# Altium PCB BOARD_2LAYER.PcbDoc (part 6 of 7)
Units mil, origin at the board's own origin, x right, y up, seen from the top; angles counter-clockwise.
Board outline 7677.17 x 7677.17 mil, 2 copper layers (Top Layer, Bottom Layer), stack 34.252 mil thick; 625 components, 375 nets, 1924 pads, 450 vias.
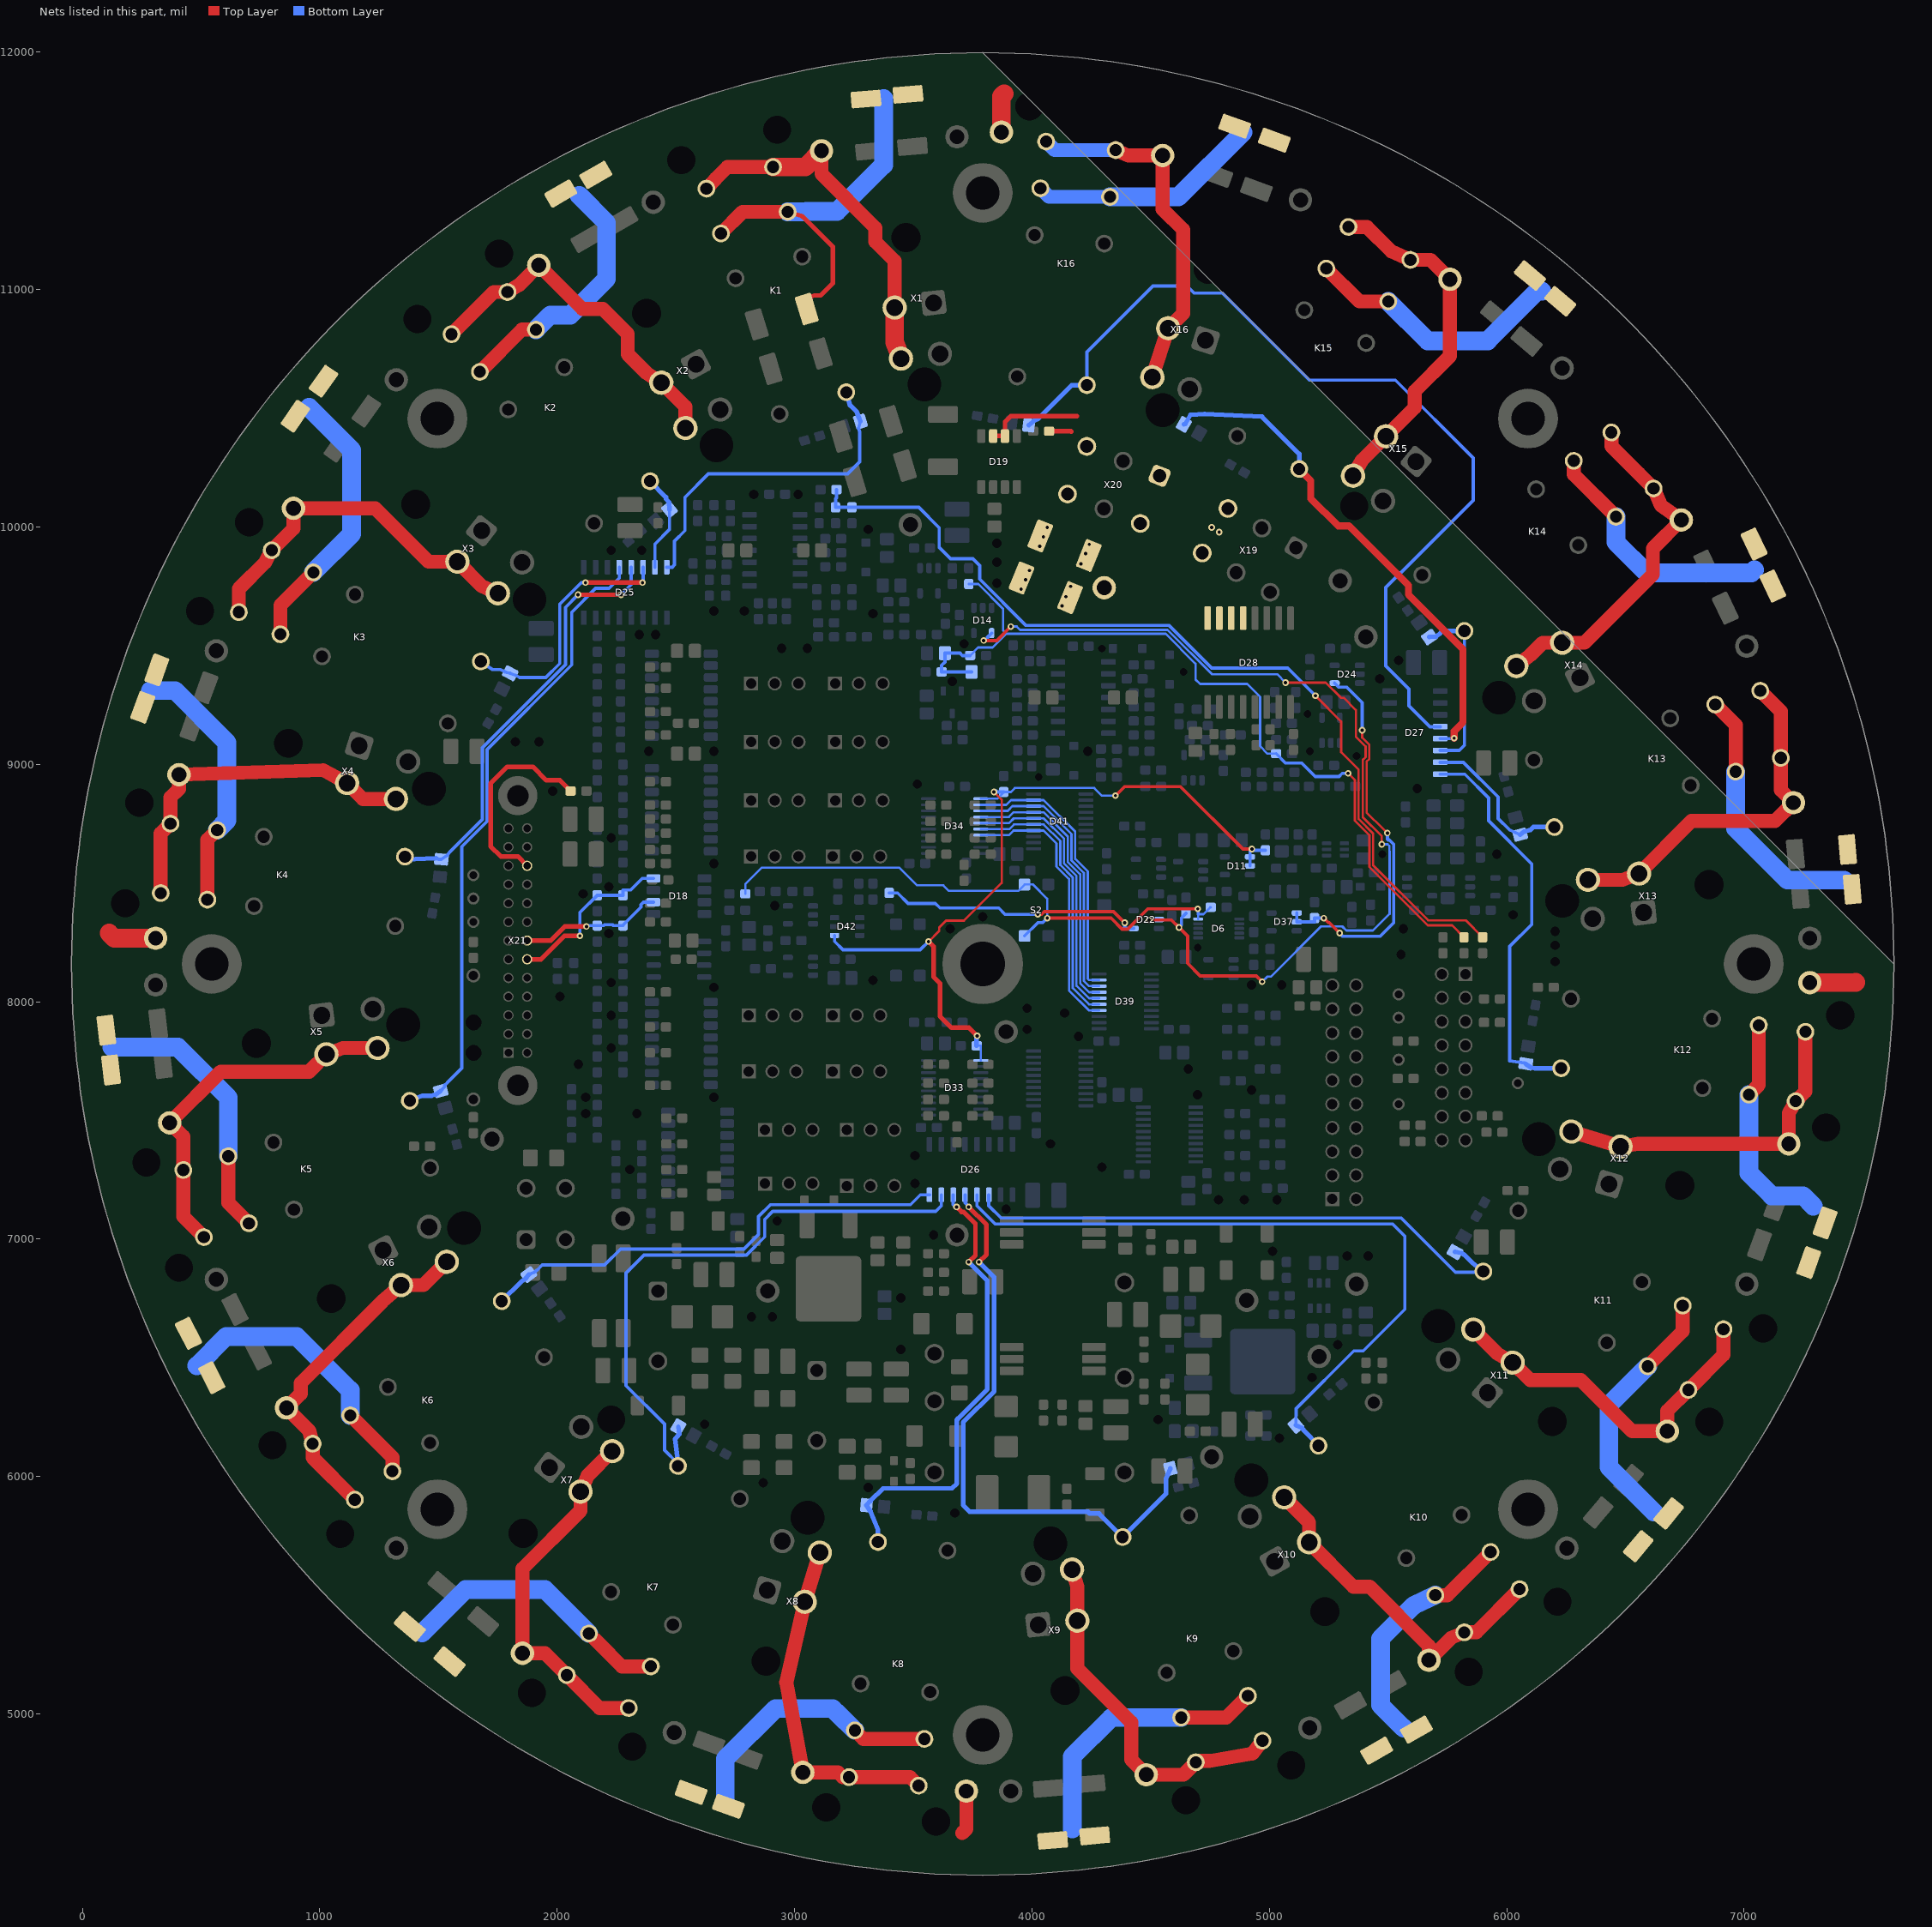
[diagram p6: the nets of this part, all layers, seen from the top]

## Via types
v1: diameter 27.56/27.56 (per signal layer), hole 13.78, Top Layer to Bottom Layer, 447 vias
v2: diameter 78.74, hole 55.12, Top Layer to Bottom Layer, 2 vias
v3: diameter 35.43/35.43 (per signal layer), hole 19.68, Top Layer to Bottom Layer, 1 vias

## Nets (pads, with @x,y where several pads share a name; then routed paths per layer and width w, separated by ;. In a path a pad name is that pad's centre, name@x,y a point inside that pad or via, vN(x,y) a via of type N, cw(c..) or ccw(c..) an arc to the next point about the centre after c; other vN are vias at no path point) (continued)
ON-CH-11: D34.17 D39.4 D41.4 | length 1152.2
  Bottom Layer w9.84: D34.17@3784.59,8701.77 3902.13,8701.77 3921.81,8721.46 D41.4@4007.03,8721.46 4049.35,8721.46 4103.44,8667.37 4103.44,8569.55 4155.98,8517 4155.98,8047.9 4240.3,7963.58 D39.4@4282.62,7963.58
ON-CH-12: D34.16 D39.5 D41.5 | length 1152.2
  Bottom Layer w9.84: D34.16@3784.59,8727.36 3904.24,8727.36 3923.92,8747.05 D41.5@4007.03,8747.05 4049.35,8747.05 4119.19,8677.21 4119.19,8576.07 4171.73,8523.53 4171.73,8057.74 4240.3,7989.17 D39.5@4282.62,7989.17
ON-CH-13: D34.15 D39.6 D41.6 | length 1152.2
  Bottom Layer w9.84: D34.15@3784.59,8752.95 3903.75,8752.95 3923.44,8772.64 D41.6@4007.03,8772.64 4049.35,8772.64 4134.94,8687.05 4134.94,8582.59 4187.48,8530.05 4187.48,8067.59 4240.3,8014.76 D39.6@4282.62,8014.76
ON-CH-14: D34.14 D39.7 D41.7 | length 1152.2
  Bottom Layer w9.84: D34.14@3784.59,8778.54 3903.27,8778.54 3922.95,8798.23 D41.7@4007.03,8798.23 4049.35,8798.23 4150.68,8696.9 4150.68,8589.11 4203.23,8536.57 4203.23,8077.43 4240.3,8040.35 D39.7@4282.62,8040.35
ON-CH-15: D34.13 D39.8 D41.8 | length 1152.2
  Bottom Layer w9.84: D34.13@3784.59,8804.13 3898.13,8804.13 3917.82,8823.82 D41.8@4007.03,8823.82 4049.35,8823.82 4166.43,8706.74 4166.43,8595.64 4218.97,8543.1 4218.97,8087.27 4240.3,8065.94 D39.8@4282.62,8065.94
ON-CH-16: D34.12 D39.9 D41.9 | length 1152.2
  Bottom Layer w9.84: D34.12@3784.59,8829.72 3891.89,8829.72 3911.58,8849.41 D41.9@4007.03,8849.41 4049.35,8849.41 4182.18,8716.58 4182.18,8602.16 4234.72,8549.62 4234.72,8097.11 4240.3,8091.54 D39.9@4282.62,8091.54
OUT: D28.5 D28.6 D28.7 D28.8 K1.11 K1.21 K2.11 K2.21 K3.11 K3.21 K4.11 K4.21 K5.11 K5.21 K6.11 K6.21 K7.11 K7.21 K8.11 K8.21 K9.11 K9.21 K10.11 K10.21 K11.11 K11.21 K12.11 K12.21 K13.11 K13.21 K14.11 K14.21 K15.11 K15.21 K16.11 K16.21 R238.2 X20.1 X20.4 | length 18165.4
  Top Layer w19.68: K1.21@2970.7,11327.78 3031.76,11309.37 3160.67,11180.46 3160.67,11026.82 3109.19,10975.34 3083.56,10975.34 3067.3,10970.36 R238.2@3051.43,10918.06
  Top Layer w59.06: K4.11@526.07,8430.33 525.73,8488.21 525.73,8682.33 K4.21@567.16,8722.74 ; K5.21@614.67,7349.36 614.67,7153.31 K5.11@701,7066.98 ; K3.11@833.73,9548.11 833.73,9670.2 K3.21@972.36,9808.82 ; K6.21@1128.14,6257.9 1305.84,6080.2 K6.11@1305.84,6022.09 ; K2.11@1674.14,10653.58 1852.08,10831.52 K2.21@1909.96,10831.28 ; K7.21@2133.57,5339.02 2174.72,5298.33 2272.66,5200.39 K7.11@2394.28,5200.39 ; K1.11@2689.87,11236.53 2781.12,11327.78 K1.21@2970.7,11327.78 ; K8.21@3253.68,4930.91 3289.66,4894.93 K8.11@3546.75,4894.93 ; K9.21@4628.74,4985.16 4818.32,4985.16 K9.11@4909.57,5076.4 ; K15.11@5240.18,11088.65 5378.8,10950.03 K15.21@5500.89,10950.03 ; K10.21@5698.99,5500.38 5749.88,5500.38 K10.11@5931.67,5682.16 ; K14.11@6282.31,10278.87 6282.31,10220.75 K14.21@6460.02,10043.05 ; K11.21@6593.51,6464.44 6741.15,6612.08 K11.11@6741.15,6720.16 ; K13.11@6878.42,9251.91 6964.75,9165.58 K13.21@6964.75,8969.54 ; K12.21@7020.63,7608.76 7061.72,7649.85 K12.11@7061.72,7901.16
  Bottom Layer w59.06: K16.11@4035.42,11426.73 4071.41,11390.74 K16.21@4328.5,11390.74
  Bottom Layer w78.74: 122.89,7808.73 402.24,7808.73 614.67,7596.3 K5.21@614.67,7349.36 ; 285.35,9310.58 390.11,9310.58 608.03,9092.65 608.03,8763.61 K4.21@567.16,8722.74 ; 481.95,6466.64 605.31,6590 901.99,6590 1128.14,6363.86 K6.21@1128.14,6257.9 ; 954.79,10503.46 1133.72,10324.53 1133.72,9970.18 K3.21@972.36,9808.82 ; 1431.06,5341.06 1613.81,5523.81 1948.78,5523.81 K7.21@2133.57,5339.02 ; K2.21@1909.96,10831.28 1971.32,10892.64 2055.28,10892.64 2207.7,11045.06 2207.7,11281.59 2093,11396.29 ; 2708.13,4644.18 2708.13,4811.13 2920.06,5023.06 3159.94,5023.06 3182.74,5000.27 K8.21@3253.68,4930.91 ; K1.21@2970.7,11327.78 3048.02,11327.78 3049.87,11329.63 3179.58,11329.63 3374.73,11524.79 3374.73,11804.73 ; 4169.85,4515.96 4169.85,4820.55 4334.46,4985.16 K9.21@4628.74,4985.16 ; K16.21@4328.5,11390.74 4617.15,11390.74 4889.08,11662.68 ; K15.21@5500.89,10950.03 5666.52,10784.4 5919.82,10784.4 6129.35,10993.92 6147.7,10993.92 ; 5566.01,4940.37 5468.39,5037.99 5468.39,5316.79 5609.39,5457.78 K10.21@5698.99,5500.38 ; K14.21@6460.02,10043.05 6460.02,9936.61 6590.39,9806.24 7030.78,9806.24 7044.12,9819.58 ; K11.21@6593.51,6464.44 6430.52,6301.46 6430.52,6039.72 6619.48,5850.77 ; K13.21@6964.75,8969.54 6964.75,8729.76 7181.6,8512.91 7420.68,8512.91 ; K12.21@7020.63,7608.76 7020.63,7278.1 7116.23,7182.5 7247.95,7182.5 7291.59,7138.86
OUT_CH1: K1.14 K1.24 TP33.1 X1.2 X1.4 | length 1559.5
  Top Layer w59.06: K1.14@2628.55,11425.25 2668.18,11467.43 2717.24,11516.49 K1.24@2909.38,11516.49 ; TP33.1@3113.33,11584.65 3113.33,11487.14 3340.38,11260.09 3340.38,11202.52 3421.62,11121.28 X1.2@3421.62,10924.16
  Top Layer w78.74: K1.24@2909.38,11516.49 3045.18,11516.49 TP33.1@3113.33,11584.65 ; X1.2@3421.62,10924.16 3421.62,10778.81 X1.4@3448.01,10709.24
OUT_CH2: K2.14 K2.24 TP35.1 X2.2 X2.4 | length 1483.8
  Top Layer w59.06: K2.14@1554.72,10812.05 1732.43,10989.75 K2.24@1790.54,10989.75 1839.93,11019.91 TP35.1@1922.38,11102.36 2106,10918.74 2192.33,10918.74 2297.06,10814.01 2297.06,10727.69 2376.05,10648.7 X2.2@2438.32,10607.96 2539.98,10506.3 X2.4@2539.98,10416.77
OUT_CH3: K3.14 K3.24 TP36.1 X3.2 X3.4 | length 1531.9
  Top Layer w59.06: K3.14@658.53,9641.27 658.53,9740.01 769.61,9851.08 K3.24@797.16,9901.98 888.92,9993.74 TP36.1@888.92,10078.74 1233.27,10078.74 1458.14,9853.87 X3.2@1579.47,9853.87 1682.25,9751.09 X3.4@1750.11,9720.56
OUT_CH4: K4.14 K4.24 TP37.1 X4.2 X4.4 | length 1486.5
  Top Layer w59.06: K4.14@329.57,8457.95 329.57,8709.26 K4.24@370.67,8750.35 370.67,8860.68 406.64,8896.65 TP37.1@406.64,8956.69 1013.62,8975.91 X4.2@1114.73,8921.36 1181.65,8854.45 X4.4@1320.67,8854.45
OUT_CH5: K5.14 K5.24 TP38.1 X5.2 X5.4 | length 1540.6
  Top Layer w59.06: K5.14@511.24,7008.97 424.91,7095.3 K5.24@424.91,7291.34 424.91,7432.51 TP38.1@367.27,7490.16 582.84,7705.73 954.73,7705.73 X5.2@1027.76,7778.76 1097.33,7805.15 X5.4@1242.68,7805.15
OUT_CH6: K6.14 K6.24 TP39.1 X6.2 X6.4 | length 1455.4
  Top Layer w59.06: K6.14@1147.37,5902.67 969.67,6080.37 K6.24@969.67,6138.49 954.44,6194.32 TP39.1@859.39,6289.37 919.25,6349.22 919.25,6393.9 1263.41,6738.06 X6.2@1341.8,6806.32 1436.43,6806.32 X6.4@1534.73,6904.62
OUT_CH7: K7.14 K7.24 TP40.1 X7.2 X7.4 | length 1545
  Top Layer w59.06: X7.4@2231.36,6107.25 2128.58,6004.47 X7.2@2098.04,5936.62 2098.04,5856.32 1853.49,5611.76 TP40.1@1853.49,5255.91 1948.33,5255.91 K7.24@2040.42,5163.82 2179.04,5025.2 K7.14@2301.13,5025.2
OUT_CH8: K8.14 K8.24 TP41.1 X8.2 X8.4 | length 1461.6
  Top Layer w59.06: X8.4@3105.94,5679.76 X8.2@3042.63,5472.68 2964.89,5133.13 TP41.1@3034.59,4753.94 3182.62,4753.94 3202.59,4733.97 K8.24@3229.49,4733.97 3486.58,4733.97 K8.14@3522.57,4697.98
OUT_CH9: K9.14 K9.24 TP42.1 X9.2 X9.4 | length 1531.3
  Top Layer w59.06: X9.4@4168.49,5608.44 4191.12,5537.56 X9.2@4191.12,5393.09 4191.12,5191.73 4417.76,4965.09 4417.76,4807.78 TP42.1@4481.44,4744.09 4637.71,4744.09 K9.24@4690.06,4796.45 4696.06,4802.44 4747.11,4802.44 4747.62,4801.93 4913.54,4830.66 4927.82,4832.7 K9.14@4970.89,4887.69
OUT_CH10: K10.14 K10.24 TP43.1 X10.2 X10.4 | length 1479.7
  Top Layer w59.06: X10.4@5062.29,5912.33 5167.26,5807.36 X10.2@5167.26,5722.95 5354.41,5535.8 5423.17,5535.8 5672.39,5286.59 TP43.1@5672.39,5226.38 5767.74,5321.73 K10.24@5821.16,5344.01 5872.05,5344.01 K10.14@6053.84,5525.8
OUT_CH11: K11.14 K11.24 TP44.1 X11.2 X11.4 | length 1517.2
  Top Layer w59.06: X11.4@5859.13,6619.15 5960.76,6517.51 X11.2@6025,6479.96 6098.89,6406.07 6312.39,6406.07 6527.52,6190.94 TP44.1@6676.32,6190.94 6676.32,6276.2 K11.24@6765.35,6365.23 6912.99,6512.87 K11.14@6912.99,6620.94
OUT_CH12: K12.14 K12.24 TP45.1 X12.2 X12.4 | length 1423.1
  Top Layer w59.06: X12.4@6272.15,7453.24 X12.2@6479.23,7389.93 6552.72,7401.57 TP45.1@7188.13,7401.57 7188.13,7531.05 K12.24@7217.12,7581.14 7258.21,7622.24 K12.14@7258.21,7873.55
OUT_CH13: K13.14 K13.24 TP46.1 X13.2 X13.4 | length 1523.2
  Top Layer w59.06: X13.4@6342.25,8513.75 6487.6,8513.75 X13.2@6557.17,8540.14 6778.4,8761.37 7130.61,8761.37 TP46.1@7207.82,8838.58 7154.5,8891.9 K13.24@7154.5,9027.55 7154.5,9223.6 K13.14@7068.17,9309.93
OUT_CH14: K14.14 K14.24 TP47.1 X14.2 X14.4 | length 1503.4
  Top Layer w59.06: X14.4@6040.35,9414.28 6098.88,9460.22 6151.24,9512.58 X14.2@6233.29,9512.58 6327.05,9512.58 6615.41,9800.94 6615.41,9909.56 TP47.1@6735.38,10029.53 6649.75,10090.44 K14.24@6618.48,10162.47 6556.68,10224.27 6440.78,10340.17 K14.14@6440.78,10398.28
OUT_CH15: K15.14 K15.24 TP48.1 X15.2 X15.4 | length 1502.7
  Top Layer w59.06: K15.14@5333.34,11263.85 5411.18,11263.85 5514.22,11160.81 K15.24@5594.05,11125.23 5679.05,11125.23 TP48.1@5760.97,11043.31 5760.97,10720.34 5612.41,10571.78 5612.41,10502.92 X15.2@5491.64,10382.14 5390,10280.51 X15.4@5352.45,10216.27
OUT_CH16: K16.14 K16.24 TP49.1 X16.2 X16.4 | length 1516.1
  Top Layer w59.06: K16.24@4352.68,11587.69 4405.9,11564.96 TP49.1@4550.34,11564.96 4550.34,11338.47 4636.37,11252.43 4636.37,10899.49 X16.2@4574.06,10837.18 X16.4@4507.15,10631.24
  Bottom Layer w59.06: K16.14@4059.6,11623.67 4095.59,11587.69 K16.24@4352.68,11587.69
R-CH-1: D25.16 H5.2 K1.A2 | length 1448.9
  Bottom Layer w13.78: D25.16@2461.56,9830.71 2484.2,9830.71 2494.25,9840.76 2494.25,9940.48 2538.17,9984.39 2538.17,10124.73 2636.95,10223.51 3223.12,10223.51 3274.31,10274.7 3274.31,10399.64 3269.13,10416.09 H5.2@3276.95,10444.32
  Bottom Layer w19.68: K1.A2@3217.67,10567.68 3233.86,10512.12 3262.6,10483.38 3267.71,10467.16 H5.2@3276.95,10444.32
R-CH-2: D25.15 H6.2 K2.A2 | length 420
  Bottom Layer w13.78: D25.15@2411.56,9830.71 2411.56,9928.02 2472.69,9989.16 2472.69,10026.58 2473.24,10042.35 H6.2@2472.69,10073.25
  Bottom Layer w19.68: K2.A2@2390.94,10193 2458.43,10125.51 2458.43,10118.09 2470.47,10103.46 H6.2@2472.69,10073.25
R-CH-3: D25.14 H7.2 K3.A2 | length 1077.4
  Top Layer w19.68: v1(2119.24,9765.75) v1(2359.39,9765.75)
  Bottom Layer w13.78: K3.A2@1678.02,9433.62 1727.69,9399.53 1760.73,9399.53 1779.58,9389.72 H7.2@1801.86,9383.57 1823.35,9375.91 1842.21,9366.1 1861.61,9366.1 1861.96,9365.75 1951.89,9365.75 2010.86,9424.72 2010.86,9675.42 2092.66,9757.23 2101.18,9765.75 v1(2119.24,9765.75) ; v1(2359.39,9765.75) 2361.56,9767.91 D25.14@2361.56,9830.71
R-CH-4: D25.13 H8.2 K4.A2 | length 1836.7
  Top Layer w19.68: v1(2087.74,9714.57) v1(2268.84,9714.57)
  Bottom Layer w13.78: H8.2@1488.94,8604.38 1495.08,8604.38 1499.2,8600.25 H8.2@1512.26,8600.25 1535.9,8616.82 1547.06,8630.78 1573.93,8657.65 1684.29,8768.01 1684.29,9070.32 2034.54,9420.56 2034.54,9661.37 v1(2087.74,9714.57) ; v1(2268.84,9714.57) 2311.56,9757.28 D25.13@2311.56,9830.71
  Bottom Layer w19.68: K4.A2@1358.6,8611.51 1359.08,8599.25 H8.2@1488.94,8604.38
R-CH-5: D25.12 H9.2 K5.A2 | length 2690.7
  Bottom Layer w13.78: H9.2@1509.16,7624.71 1526.17,7641.72 1526.17,7648.11 1537.87,7659.81 1537.87,7661.49 1597.33,7720.95 1597.33,8653.21 1703.98,8759.86 1703.98,9062.16 2061.12,9419.3 2061.12,9640.88 2161.95,9741.71 2218.23,9741.71 2261.56,9785.03 D25.12@2261.56,9830.71
  Bottom Layer w19.68: K5.A2@1378.96,7583.03 1432.64,7604.64 1471.5,7604.64 1487.93,7609.04 H9.2@1509.16,7624.71
R-CH-6: D26.16 H10.2 K6.A2 | length 2028.1
  Bottom Layer w13.78: H10.2@1880.19,6850.74 1901.48,6860.04 1918.34,6872.74 1936.59,6890.99 2199.57,6890.99 2267.22,6958.64 2786.78,6958.64 2848.33,7020.19 2848.33,7095.04 2898.52,7145.22 3488.09,7145.22 3529.87,7187.01 D26.16@3568.25,7187.01
  Bottom Layer w19.68: K6.A2@1766.42,6738.88 1849.16,6821.62 1867.26,6835.26 H10.2@1880.19,6850.74
R-CH-7: D26.15 H11.2 K7.A2 | length 2599.7
  Bottom Layer w9.84: K7.A2@2508.78,6044.68 K7.A2@2508.78,6056.26
  Bottom Layer w13.78: K7.A2@2508.78,6056.26 2507.18,6056.26 2452.3,6111.14 2452.3,6220.82 2289.99,6383.14 2289.99,6857.73 2365.31,6933.05 2797.38,6933.05 2873.92,7009.59 2873.92,7083.23 2907.98,7117.29 3594.79,7117.29 3618.25,7140.75 D26.15@3618.25,7187.01
  Bottom Layer w19.68: K7.A2@2508.78,6056.26 2497.05,6157.97 2513.98,6179.17 H11.2@2510.07,6209.65
R-CH-8: D26.14 H12.2 K8.A2 | length 1945.3
  Top Layer w19.68: v1(3682.23,7135.83) 3703.11,7114.95 3711.81,7114.95 3761.68,7065.07 3761.68,6931.82 v1(3733.41,6903.54)
  Bottom Layer w13.78: D26.14@3668.25,7187.01 3668.25,7145.67 v1@3678.09,7135.83
  Bottom Layer w19.68: K8.A2@3351.08,5724.17 3351.08,5775.26 3319.46,5853.51 H12.2@3302.45,5879.24 3319.81,5897.45 3372.86,5950.5 3663.29,5950.5 3683.93,5971.14 3683.93,6238.31 3687.12,6241.51 3687.12,6243.53 3811.74,6368.15 3811.74,6825.21 v1(3733.41,6903.54) ; v1@3678.09,7135.83 v1(3682.23,7135.83)
R-CH-9: D26.13 H13.2 K9.A2 | length 2533.9
  Top Layer w19.68: v1(3733.41,7135.83) 3807.93,7061.31 3807.93,6934.76 v1(3776.72,6903.54)
  Bottom Layer w13.78: D26.13@3718.25,7187.01 3718.25,7153.22 v1@3733.41,7138.07
  Bottom Layer w19.68: v1(3733.41,7135.83) v1@3733.41,7138.07 ; v1(3776.72,6903.54) 3840.69,6839.56 3840.69,6358.89 3709.52,6227.71 3709.52,5879.89 3737.36,5852.05 4235.38,5852.05 4242.79,5844.65 4282.38,5844.65 K9.A2@4381.77,5745.26 4563.85,5927.33 4563.85,5989.43 4570.55,6005.39 H13.2@4583.11,6033.63
R-CH-10: D26.12 H14.2 K10.A2 | length 3041.2
  Bottom Layer w13.78: D26.12@3768.25,7187.01 3768.25,7140.75 3844.82,7064.18 5519.1,7064.18 5570.92,7012.36 5570.92,6704.59 5395.72,6529.39 5355.54,6529.39 5112.75,6286.61 5112.75,6262.79 5111.69,6247.02 H14.2@5112.24,6216.12
  Bottom Layer w19.68: H14.2@5112.24,6216.12 5136.94,6204.77 5147.47,6192.22 5167.33,6172.35 K10.A2@5206.95,6130.16
R-CH-11: D26.11 H15.2 K11.A2 | length 2395
  Bottom Layer w13.78: D26.11@3818.25,7187.01 3818.25,7140.75 3869.84,7089.16 5555.75,7089.16 5783.67,6861.23 5898.56,6861.23 K11.A2@5901.37,6864.05
  Bottom Layer w19.68: H15.2@5781.64,6945.96 5807.73,6942.02 5822.46,6933.51 5856,6899.98 K11.A2@5901.37,6864.05
R-CH-12: D27.16 H16.2 K12.A2 | length 1690.6
  Bottom Layer w13.78: D27.16@5719.63,8958.86 5823.69,8958.86 5923.83,8858.71 5923.83,8762.17 6105.52,8580.48 6105.52,8325.73 6012.82,8233.03 6012.82,7751.22 6076.13,7742.33 H16.2@6080.57,7738.55
  Bottom Layer w19.68: H16.2@6080.57,7738.55 6103.1,7722.36 6119.94,7719.99 K12.A2@6229.19,7719.99
R-CH-13: D27.15 H17.2 K13.A2 | length 666.3
  Bottom Layer w13.78: D27.15@5719.63,9008.86 5817.67,9008.86 5963.73,8862.8 5963.73,8772.3 6012.31,8723.72 6027.8,8716.48 H17.2@6056.08,8704.03
  Bottom Layer w19.68: H17.2@6056.08,8704.03 6072.98,8716.86 6100.01,8724.1 6111.79,8735.87 K13.A2@6200.46,8735.87
R-CH-14: D27.14 H18.2 K14.A2 | length 749
  Bottom Layer w13.78: D27.14@5719.63,9058.86 5800.21,9058.86 5821.74,9080.38 K14.A2@5821.74,9562.07
  Bottom Layer w19.68: H18.2@5674.15,9536.29 5702.25,9539 5716.18,9548.75 5729.5,9562.07 K14.A2@5821.74,9562.07
R-CH-15: D27.13 H19.2 K15.A2 | length 2159.2
  Top Layer w29.53: K15.A2@5125.69,10244.37 5174.43,10195.62 5174.43,10119.62 5289.29,10004.76 5335.49,10004.76 5585.88,9754.37 5585.88,9715.36 5815.99,9485.25 5815.99,9177.07 5778.68,9139.76 v1(5778.68,9110.24)
  Bottom Layer w13.78: D27.13@5719.63,9108.86 5777.31,9108.86 v1(5778.68,9110.24)
  Bottom Layer w19.68: H19.2@4639.58,10432.09 4645.75,10434.44 4667.62,10472.35 4727.57,10476.09 4968.87,10464.39 5125.69,10307.58 K15.A2@5125.69,10244.37
R-CH-16: D27.12 H20.2 K16.A2 | length 3899.8
  Bottom Layer w13.78: K16.A2@4231.1,10597.48 4231.1,10736.56 4509.52,11014.98 4653.07,11014.98 4682.59,10985.47 4802.29,10985.47 5169.17,10618.59 5530.84,10618.59 5858.95,10290.48 5858.95,10111.61 5553.69,9806.34 5551.69,9806.34 5490.63,9745.28 5490.63,9415.22 5588.37,9317.49 5588.37,9246.81 5676.32,9158.86 D27.12@5719.63,9158.86
  Bottom Layer w19.68: H20.2@3987.07,10428.51 4010.1,10448.68 4025.99,10455.59 4167.88,10597.48 K16.A2@4231.1,10597.48
Ref: C81.1 C82.1 R170.1 R204.1 R223.1 R225.1 R243.1 | length 3617.8
  Top Layer w9.84: v1(5331.83,8962.6) 5360.1,8934.33 5360.1,8763.06 5421.4,8701.75 5421.4,8567.96 5667.28,8322.08 5769.6,8322.08 R170.1@5820.02,8271.65
  Bottom Layer w9.84: R225.1@3733.41,9759.84 3773.9,9759.84 3878.22,9655.52 3878.22,9565.32 3890.96,9552.57 3890.96,9550.22 ; R204.1@3739.31,9458.66 3773.35,9492.7 3833.44,9492.7 3890.96,9550.22 ; R223.1@5028.68,9045.28 4992.42,9045.28 4960.77,9076.92 4960.77,9284.47 4906.16,9339.07 4707.96,9339.07 4689.12,9357.92 4689.12,9424.09 4562.99,9550.22 3893.31,9550.22 3890.96,9550.22
  Bottom Layer w13.78: R204.1@3739.31,9458.66 3706.83,9458.66 3696.99,9468.5 C82.1@3633.01,9468.5 3633.01,9431.17 3619.24,9417.39 R243.1@3619.24,9389.76 C81.1@3745.22,9389.76 ; R223.1@5028.68,9045.28 5068.12,9005.84 5136.53,9005.84 5193.2,8949.17 5293.8,8949.17 5307.23,8962.6 v1(5331.83,8962.6)
REZET: D6.5 R91.1 R178.2 S2.3 S2.4 | length 2424.1
  Top Layer w13.78: v1(4064.12,8352.36) 4333.62,8352.36 4379.88,8306.1 4402.39,8306.1 4488.02,8391.73 v1(4697.98,8391.73)
  Bottom Layer w9.84: R178.2@2792.46,8454.72 2792.46,8495.69 2861.9,8565.13 3440.99,8565.13 3515.69,8490.44 3626.4,8490.44 3649.58,8467.26 3942.01,8467.26 S2.4@3968.84,8494.09 4004.72,8494.09 4064.12,8434.7 v1(4064.12,8352.36) ; D6.5@4699.94,8348.43 4699.94,8368.6 4721.93,8368.6 4751.13,8397.8 R91.1@4753.09,8397.8
  Bottom Layer w13.78: S2.3@3968.84,8277.56 4024.85,8333.57 4045.33,8333.57 v1(4064.12,8352.36) ; v1(4697.98,8391.73) 4697.98,8382.38 4699.94,8380.41 4699.94,8368.6
REZET_COM: C134.2 D18.4 R79.2 X21.19 | length 744
  Top Layer w19.68: X21.19@1873.17,8179.13 1931.65,8179.13 2030.08,8277.56 v1(2095.61,8277.56)
  Bottom Layer w13.78: v1(2095.61,8277.56) 2095.61,8375.98 C134.2@2168.45,8448.82 R79.2@2276.72,8448.82 2276.72,8470.86 2309.2,8470.86 2358.22,8519.88 D18.4@2405.46,8519.88
SHILD: R186.2 X21.24 | length 860.8
  Top Layer w19.68: X21.24@1873.17,8572.83 1833.74,8612.27 1762.15,8612.27 1719.3,8655.12 1719.3,8919.63 1789.59,8989.92 1896.89,8989.92 1954.03,8932.78 2011.25,8932.78 R186.2@2056.24,8887.8
TABU: D22.4 R181.1 | length 1113.5
  Top Layer w13.78: v1(4024.75,8368.11) 4039.71,8368.11 4051.65,8380.06 4343.51,8380.06 v1(4390.89,8332.68)
  Bottom Layer w13.78: R181.1@3398.76,8458.66 3433.8,8458.66 3477.96,8414.5 3593.01,8414.5 3612.51,8395 3860.04,8395 3886.93,8368.11 v1(4024.75,8368.11) ; v1(4390.89,8332.68) 4390.89,8312.01 4393.84,8309.06 D22.4@4428.29,8309.06
TABU_I: D24.4 D37.1 D37.2 R95.1 | length 1662.5
  Top Layer w9.84: v1(5390.89,9143.7) 5390.89,9112.43 5421,9082.32 5421,9023.52 5409.59,9012.11 5409.59,8797.7 5479.26,8728.03 5479.79,8728.03 v1(5497.19,8710.63)
  Top Layer w13.78: v1(5229.47,8352.36) 5248.26,8333.57 5252.2,8333.57 v1(5296.4,8289.37)
  Bottom Layer w13.78: D37.1@5115.3,8374.02 D37.2@5115.3,8336.61 5190.1,8336.61 R95.1@5190.1,8352.36 v1(5229.47,8352.36) ; D24.4@5274.75,9342.52 5291.91,9325.36 5325.96,9325.36 5390.89,9260.43 v1(5390.89,9143.7) ; v1(5296.4,8289.37) 5310.14,8275.63 5465.78,8275.63 5523.55,8333.4 5523.55,8362.65 5523.92,8363.03 5523.92,8642.09 5523.76,8642.25 5523.76,8662.85 5505.51,8681.1 5500.14,8681.1 5497.19,8684.06 v1(5497.19,8710.63)
TABU_U: D14.4 D22.2 R94.1 | length 4166.5
  Top Layer w9.84: v1(5068.05,9344.49) 5156.94,9344.49 5237.68,9344.5 5301.55,9280.63 5313.08,9280.63 5364.53,9229.18 5364.53,9116.52 5405.25,9075.8 5405.25,9030.04 5393.8,9018.6 5393.8,8777.95 5473.57,8698.18 v1(5473.57,8663.39)
  Top Layer w13.78: v1(3796.4,9521.65) 3851.52,9521.65 v1(3910.57,9580.71) ; v1(4493.25,8344.49) 4587.74,8344.49 v1(4619.24,8312.99) 4655.69,8276.53 4655.69,8161.97 4708.78,8108.88 4945.39,8108.88 v1(4969.63,8084.65)
  Bottom Layer w9.84: v1(3910.57,9580.71) 3935.67,9580.71 3949.68,9566.7 4571.17,9566.7 4757.95,9379.92 5032.63,9379.92 v1(5068.05,9344.49) ; v1(4969.63,8084.65) 4990.97,8105.98 5005.6,8105.98 5217.05,8317.43 5306.96,8317.43 5324.2,8300.2 5436.04,8300.2 5506.2,8370.36 5506.2,8634.75 5506.05,8634.91 5506.05,8655.51 5498.17,8663.39 v1(5473.57,8663.39)
  Bottom Layer w13.78: v1(3796.4,9521.65) 3797.39,9520.67 3807.23,9520.67 3812.7,9526.15 3812.7,9535.99 D14.4@3829.87,9553.15 ; v1(4493.25,8344.49) 4495.22,8346.46 D22.2@4534.59,8346.46 ; v1(4619.24,8312.99) 4629.93,8323.68 4629.93,8353.21 R94.1@4648.76,8372.05
U_SUM_COM: C114.2 R172.1 R174.1 R217.1 | length 3910.6
  Top Layer w9.84: v1(5194.04,9289.37) 5302.71,9180.7 5302.71,9051.21 5375.85,8978.08 5375.85,8769.58 5437.15,8708.28 5437.15,8574.48 5668.38,8343.24 5827.17,8343.24 R172.1@5898.76,8271.65
  Bottom Layer w13.78: R174.1@3176.32,10157.48 3176.32,10123.03 3172.39,10119.09 R217.1@3172.39,10082.68 C114.2@3241.28,10082.68 3523.33,10082.68 3608.81,9997.19 3608.81,9915.1 3657.31,9866.6 3750.44,9866.6 3779.73,9837.32 3779.73,9780.6 3975.18,9585.15 4577.77,9585.15 4757.13,9405.79 5077.61,9405.79 v1(5194.04,9289.37)
WRITE: D11.1 D11.2 D33.11 D34.11 D42.4 R59.1 R60.1 R101.1 | length 3391.6
  Top Layer w9.84: v1(3564.12,8253.94) 3609.17,8298.99 3609.17,8312.78 3638.08,8341.69 3713.48,8341.69 3872.45,8500.66 3872.45,8851.12 v1(3839.71,8883.86)
  Top Layer w13.78: v1(4351.52,8868.11) 4389.99,8906.58 4625.42,8906.58 4888.3,8643.7 v1(4926.32,8643.7)
  Top Layer w19.68: v1(3564.12,8253.94) 3584.96,8233.09 3584.96,8105.49 3612.26,8078.2 3612.26,7939.72 3661.07,7890.9 3734.24,7890.9 v1(3768.84,7856.3)
  Bottom Layer w9.84: R60.1@3766.87,7814.96 3784.59,7814.96 D33.11@3784.59,7752.95 ; D34.11@3784.59,8855.32 3854.47,8855.32 3881.05,8881.89 R59.1@3881.05,8883.86 3911.56,8883.86 3928.29,8900.59 4009.3,8900.59 4009.46,8900.43 4262.6,8900.43 4294.93,8868.11 v1(4351.52,8868.11)
  Bottom Layer w13.78: D42.4@3168.45,8279.53 3168.45,8254.55 3203.97,8219.02 3529.21,8219.02 v1(3564.12,8253.94) ; v1(3839.71,8883.86) 3844.41,8888.56 3848.57,8888.56 3853.27,8883.86 R59.1@3881.05,8883.86 ; D11.2@4918.45,8572.83 D11.1@4918.45,8610.24 4918.45,8634.84 v1@4927.31,8643.7 ; v1(4926.32,8643.7) v1@4927.31,8643.7 ; R101.1@4983.41,8637.8 4933.21,8637.8 v1@4927.31,8643.7
  Bottom Layer w19.68: R60.1@3766.87,7814.96 3766.87,7854.33 v1(3768.84,7856.3)
WRITE_COM: C133.2 D18.2 R78.2 X21.20 | length 610.2
  Top Layer w19.68: X21.20@1873.17,8257.87 1972.58,8257.87 2031.64,8316.93 v1(2123.17,8316.93)
  Bottom Layer w13.78: v1(2123.17,8316.93) 2127.11,8320.87 C133.2@2168.45,8320.87 2196.74,8320.87 2200.93,8325.05 2231.73,8325.05 2235.92,8320.87 R78.2@2276.72,8320.87 2276.72,8322.83 2352.86,8398.98 2352.86,8409.61 2363.13,8419.88 D18.2@2405.46,8419.88
~IN_COM: R33.1 R34.1 TP11.1 X19.3 X19.6
  other v1: 4127.11,9667.32 4142.86,9706.69 4162.54,9750 4205.85,9844.49 4225.53,9887.8 4241.28,9927.17 4788.53,9978.35 4757.03,9998.03
~OUT: C116.2 D19.2 D19.3 R1.1 R2.1 R3.1 R4.1 R5.1 R6.1 R7.1 R8.1 R9.1 R10.1 R11.1 R12.1 R13.1 R14.1 R15.1 R16.1 R17.1 R18.1 R19.1 R20.1 R21.1 R22.1 R23.1 R24.1 R25.1 R26.1 R27.1 R28.1 R29.1 R30.1 R31.1 R32.1 R33.2 R34.2 TP1.1 TP2.1 TP3.1 TP4.1 X20.3 X20.6 | length 1488.2
  Top Layer w9.84: v1(3953.88,9738.19) 3953.88,9762.8 3954.54,9762.8 3956,9764.26 R33.2@3956,9785.39 ; v1(3973.57,9777.56) 3963.29,9777.56 3963.29,9778.11 R33.2@3956,9785.39 ; v1(3989.31,9816.93) 3971.91,9799.53 3970.14,9799.53 R33.2@3956,9785.39 ; v1(4032.62,9919.29) 4032.62,9960.43 R34.2@4034.74,9962.56 R34.2@4035.25,9963.07 ; v1(4048.37,9958.66) 4043.96,9963.07 R34.2@4035.25,9963.07 ; v1(4064.12,9998.03) 4046.72,9980.63 4046.72,9974.53 R34.2@4035.25,9963.07
  Top Layer w19.68: D19.3@3836.36,10383.07 D19.2@3886.36,10383.07 3886.36,10442.93 3910.07,10466.63 4187.4,10466.63 4188.42,10467.65 ; C116.2@4071.99,10403.54 4163.68,10403.54 4164.96,10402.27
  Top Layer w59.06: 3705.94,4497.98 3723.57,4515.61 TP4.1@3723.57,4675.2
  Top Layer w78.74: 112.31,8289.06 133.65,8267.72 TP3.1@308.21,8267.72 ; TP1.1@3871.2,11663.39 3871.2,11814.39 3882.34,11825.53 ; TP2.1@7276.72,8080.71 7468.62,8080.71 7470.02,8082.1
pads on no net: D4.14 D4.15 D4.16 D4.17 D4.26 D4.27 D4.28 D6.2 D6.7 D25.10 D25.11 D26.10 D27.10 D27.11 D28.9 D28.16 KW9. KW10. X1. X2. X3. X4. X5. X6. X7. X8. X9. X10. X11. X12. X13. X14. X15. X16. X17.17 X17.18 X19.2 X19.5 X20.2 X20.5 X21.

## Polygon pours and split planes (outlines as drawn)
+U_COM on Bottom Layer "+U_COM_L02_P107" (solid, remove dead copper, pour order 107): 2453.88,7027.56 2552.31,7027.56 2552.31,7135.83 2453.88,7135.83
+U_COM on Bottom Layer "+U_COM_L02_P106" (solid, remove dead copper, pour order 106): 2552.31,7027.56 2591.68,7027.56 2591.68,7549.21 2552.31,7549.21
+U_COM on Bottom Layer "+U_COM_L02_P105" (solid, remove dead copper, pour order 105): 2522.78,7618.11 2591.68,7549.21 2552.31,7549.21 2483.41,7618.11
+U_COM on Bottom Layer "+U_COM_L02_P104" (solid, remove dead copper, pour order 104): 2483.41,7618.11 2522.78,7618.11 2522.78,9478.35 2483.41,9478.35
-U_COM on Bottom Layer "-U_COM_L02_P103" (solid, remove dead copper, pour order 103): 2611.36,7135.83 2650.73,7135.83 2650.73,7549.21 2611.36,7549.21
-U_COM on Bottom Layer "-U_COM_L02_P102" (solid, remove dead copper, pour order 102): 2542.46,7618.11 2611.36,7549.21 2650.73,7549.21 2581.83,7618.11
-U_COM on Bottom Layer "-U_COM_L02_P101" (solid, remove dead copper, pour order 101): 2542.46,8061.02 2562.15,8061.02 2562.15,8572.83 2542.46,8572.83
-U_COM on Bottom Layer "-U_COM_L02_P100" (solid, remove dead copper, pour order 100): 2542.46,7618.11 2581.83,7618.11 2581.83,8070.87 2542.46,8070.87
-U_COM on Bottom Layer "-U_COM_L02_P099" (solid, remove dead copper, pour order 99): 2542.46,8572.83 2591.68,8572.83 2591.68,9478.35 2542.46,9478.35
-U_COM on Bottom Layer "-U_COM_L02_P098" (solid, remove dead copper, pour order 98): 2591.68,8572.83 2562.15,8543.31 2562.15,8572.83
-U_COM on Bottom Layer "-U_COM_L02_P097" (solid, remove dead copper, pour order 97): 2581.83,8070.87 2562.15,8090.55 2562.15,8070.87
-U_COM on Bottom Layer "-U_COM_L02_P096" (solid, remove dead copper, pour order 96): 2562.15,8297.24 2581.83,8297.24 2581.83,8316.93 2562.15,8316.93
-U_COM on Bottom Layer "-U_COM_L02_P095" (solid, remove dead copper, pour order 95): 2581.83,8316.93 2562.15,8336.61 2562.15,8316.93
-U_COM on Bottom Layer "-U_COM_L02_P094" (solid, remove dead copper, pour order 94): 2581.83,8297.24 2562.15,8277.56 2562.15,8297.24
-U_COM on Bottom Layer "-U_COM_L02_P093" (solid, remove dead copper, pour order 93): 2611.36,7027.56 2690.1,7027.56 2690.1,7135.83 2611.36,7135.83
-U_COM on Bottom Layer "-U_COM_L02_P092" (solid, remove dead copper, pour order 92): 2690.1,7135.83 2650.73,7165.35 2650.73,7135.83
-U_COM on Bottom Layer "-U_COM_L02_P091" (solid, remove dead copper, pour order 91): 4520.81,6938.98 3733.41,6938.98 3733.41,6692.91 3457.82,6692.91 3457.82,6850.39 3310.18,6850.39 3310.18,6643.7 2955.85,6643.7 2955.85,6850.39 2857.42,6850.39 2857.42,6919.29 2946.01,7007.87 4520.81,7007.87
$3N7062 on Bottom Layer "$3N7062_L02_P090" (solid, remove dead copper, pour order 90): 2522.78,6564.96 2916.48,6564.96 2916.48,6594.49 2522.78,6594.49
$3N7062 on Bottom Layer "$3N7062_L02_P089" (solid, remove dead copper, pour order 89): 3684.2,6377.95 2916.48,6377.95 2916.48,6594.49 3625.14,6594.49 3684.2,6535.43
$3N7062 on Bottom Layer "$3N7062_L02_P088" (solid, remove dead copper, pour order 88): 2483.41,6564.96 2699.94,6564.96 2699.94,6860.24 2483.41,6860.24
$3N7062 on Bottom Layer "$3N7062_L02_P087" (solid, remove dead copper, pour order 87): 2345.61,6653.54 2483.41,6653.54 2483.41,6860.24 2345.61,6860.24
$3N7061 on Bottom Layer "$3N7061_L02_P086" (solid, remove dead copper, pour order 86): 3644.83,6033.46 2886.95,6033.46 2886.95,6338.58 3044.43,6338.58 3044.43,6181.1 3142.86,6181.1 3142.86,6338.58 3644.83,6338.58
$3N7061 on Bottom Layer "$3N7061_L02_P085" (solid, remove dead copper, pour order 85): 2650.73,6269.69 2886.95,6033.46 2886.95,6269.69
$3N7061 on Bottom Layer "$3N7061_L02_P084" (solid, remove dead copper, pour order 84): 2345.61,6269.69 2886.95,6269.69 2886.95,6535.43 2345.61,6535.43
GND on Bottom Layer "GND_L02_P051" (solid, remove dead copper, pour order 51): 4707.82,6702.76 4816.09,6702.76 4816.09,6781.5 4707.82,6781.5
GND on Bottom Layer "GND_L02_P050" (solid, remove dead copper, pour order 50): 4678.29,6781.5 4845.61,6781.5 4845.61,6988.19 4678.29,6988.19
GND on Bottom Layer "GND_L02_P048" (solid, remove dead copper, pour order 48): 4560.18,6899.61 4845.61,6899.61 4845.61,6988.19 4560.18,6988.19
GND on Bottom Layer "GND_L02_P047" (solid, remove dead copper, pour order 47): 4520.81,6781.5 4845.61,6781.5 4845.61,6899.61 4520.81,6899.61
GND on Bottom Layer "GND_L02_P044" (solid, remove dead copper, pour order 44): 5416.48,7145.67 5642.86,7145.67 5642.86,8129.92 5416.48,8129.92
GND on Bottom Layer "GND_L02_P033" (solid, remove dead copper, pour order 33): 4520.81,6013.78 4373.17,5866.14 3733.41,5866.14 3733.41,6190.94 3871.2,6328.74 3871.2,6899.61 4520.81,6899.61
GND on Bottom Layer "GND_L02_P032" (solid, remove dead copper, pour order 32): 4520.81,6594.49 4619.24,6594.49 4619.24,6781.5 4520.81,6781.5
GND on Bottom Layer "GND_L02_P031" (solid, remove dead copper, pour order 31): 4520.81,6122.05 4619.24,6122.05 4619.24,6338.58 4520.81,6338.58
GND on Bottom Layer "GND_L02_P022" (solid, remove dead copper, pour order 22): 4520.81,6466.54 4855.46,6466.54 4855.46,6486.22 4520.81,6486.22
~IN_COM on Bottom Layer "~IN_COM_L02_P020" (solid, remove dead copper, pour order 20): 4596.32,9838.68 4729.49,9761.79 4907.16,10069.52 4773.99,10146.41
~IN_COM on Bottom Layer "~IN_COM_L02_P018" (solid, remove dead copper, pour order 18): 4383.01,9763.78 4727.5,9763.78 4727.5,9872.05 4383.01,9872.05
~IN_COM on Bottom Layer "~IN_COM_L02_P016" (solid, remove dead copper, pour order 16): 4438.26,9859.05 4356.02,9655.51 4105.01,9655.51 4078.59,9666.19 4196.05,9956.91
IN_COM on Bottom Layer "IN_COM_L02_P013" (solid, remove dead copper, pour order 13): 5389.22,9791.61 5304.96,9645.67 4985.11,9645.67 4903.85,9692.58 5068.07,9977.03
OUT on Bottom Layer "OUT_L02_P009" (solid, remove dead copper, pour order 9): 7591.68,8159.45 ccw(c3792.46,8159.45) 3792.46,11958.66 ccw(c3792.46,8159.45) -6.75,8159.45 ccw(c3792.46,8159.45) 3792.46,4360.24 ccw(c3792.46,8159.45) 7591.68,8159.45 ccw(c3792.46,8159.45)
OUT on Bottom Layer "OUT_L02_P008" (solid, remove dead copper, pour order 8): 4368.57,9984.78 4539.49,9915.72 4677.19,10256.53 4506.27,10325.59
~OUT on Bottom Layer "~OUT_L02_P000" (solid, remove dead copper, pour order 0): 4335.71,10382.57 4051.26,9678.53 3940.1,9723.44 3940.1,9866.48 4174.87,10447.55
GND on Top Layer "GND_L01_P083" (solid, remove dead copper, pour order 83): 3447.98,8834.65 3481.44,8868.11 3447.98,8868.11
GND on Top Layer "GND_L01_P082" (solid, remove dead copper, pour order 82): 3447.98,8868.11 3782.62,8868.11 3782.62,8927.17 3447.98,8927.17
GND on Top Layer "GND_L01_P081" (solid, remove dead copper, pour order 81): 3812.15,7795.28 3861.36,7746.06 3861.36,7795.28
GND on Top Layer "GND_L01_P080" (solid, remove dead copper, pour order 80): 3447.98,7734.25 3509,7795.28 3447.98,7795.28
GND on Top Layer "GND_L01_P079" (solid, remove dead copper, pour order 79): 3774.75,7421.26 3861.36,7507.87 3861.36,7421.26
GND on Top Layer "GND_L01_P078" (solid, remove dead copper, pour order 78): 3447.98,7529.53 3556.24,7421.26 3447.98,7421.26
GND on Top Layer "GND_L01_P077" (solid, remove dead copper, pour order 77): 3447.98,8665.35 3550.34,8562.99 3447.98,8562.99
GND on Top Layer "GND_L01_P076" (solid, remove dead copper, pour order 76): 5613.33,6775.59 5519.83,6663.39 4924.35,6663.39 5062.15,6801.18 5062.15,6958.66 5199.94,6958.66 5199.94,7096.46 4353.49,7096.46 4353.49,7214.57 3398.76,7214.57 3398.76,7421.26 3861.36,7421.26 3861.36,7795.28 3398.76,7795.28 3398.76,9448.82 3861.36,9448.82 3861.36,9507.87 4589.71,9507.87 4589.71,9153.54 4668.45,9074.8 5150.73,9074.8 5150.73,7116.14 5416.48,7116.14 5416.48,7352.36 5613.33,7352.36
GND on Top Layer "GND_L01_P075" (solid, remove dead copper, pour order 75): 1440.1,8090.55 1499.16,8031.5 1499.16,8090.55
GND on Top Layer "GND_L01_P074" (solid, remove dead copper, pour order 74): 1440.1,7667.32 1499.16,7726.38 1499.16,7667.32
GND on Top Layer "GND_L01_P073" (solid, remove dead copper, pour order 73): 5682.23,6781.5 5790.5,6889.76 5682.23,6889.76
GND on Top Layer "GND_L01_P072" (solid, remove dead copper, pour order 72): 5682.23,6889.76 5800.34,6889.76 5800.34,7086.61 5682.23,7086.61
GND on Top Layer "GND_L01_P071" (solid, remove dead copper, pour order 71): 5800.34,6889.76 5849.55,6938.98 5800.34,6938.98
GND on Top Layer "GND_L01_P070" (solid, remove dead copper, pour order 70): 5633.01,6968.5 5682.23,7017.72 5682.23,6968.5
GND on Top Layer "GND_L01_P069" (solid, remove dead copper, pour order 69): 5485.38,6781.5 5682.23,6781.5 5682.23,6968.5 5485.38,6968.5
GND on Top Layer "GND_L01_P068" (solid, remove dead copper, pour order 68): 6066.09,7450.79 6075.93,7450.79 6075.93,7470.47 6066.09,7470.47
GND on Top Layer "GND_L01_P067" (solid, remove dead copper, pour order 67): 6036.56,7411.42 6075.93,7450.79 6036.56,7450.79
GND on Top Layer "GND_L01_P066" (solid, remove dead copper, pour order 66): 5997.19,7145.67 5938.13,7086.61 5682.23,7086.61 5682.23,7273.62 5997.19,7273.62
GND on Top Layer "GND_L01_P065" (solid, remove dead copper, pour order 65): 6066.09,7460.63 6125.14,7519.69 6066.09,7519.69
GND on Top Layer "GND_L01_P064" (solid, remove dead copper, pour order 64): 6125.14,7519.69 6066.09,7519.69 6066.09,7450.79 6036.56,7450.79 6036.56,8415.35 6125.14,8415.35
GND on Top Layer "GND_L01_P063" (solid, remove dead copper, pour order 63): 5475.53,6653.54 5140.89,6318.9 4825.93,6318.9 4825.93,6663.39 5475.53,6663.39
GND on Top Layer "GND_L01_P062" (solid, remove dead copper, pour order 62): 5800.34,6938.98 5898.76,6938.98 5898.76,7086.61 5800.34,7086.61
GND on Top Layer "GND_L01_P061" (solid, remove dead copper, pour order 61): 5997.19,7145.67 6036.56,7185.04 5997.19,7185.04
GND on Top Layer "GND_L01_P060" (solid, remove dead copper, pour order 60): 5859.39,7273.62 6036.56,7450.79 6036.56,7273.62
GND on Top Layer "GND_L01_P059" (solid, remove dead copper, pour order 59): 5997.19,7185.04 6036.56,7185.04 6036.56,7273.62 5997.19,7273.62
GND on Top Layer "GND_L01_P058" (solid, remove dead copper, pour order 58): 5091.68,7096.46 5199.94,6988.19 5199.94,7096.46
GND on Top Layer "GND_L01_P057" (solid, remove dead copper, pour order 57): 5583.8,8090.55 5682.23,8090.55 5682.23,8307.09 5583.8,8307.09
GND on Top Layer "GND_L01_P056" (solid, remove dead copper, pour order 56): 5495.22,8090.55 5583.8,8090.55 5583.8,8385.83 5495.22,8385.83
GND on Top Layer "GND_L01_P055" (solid, remove dead copper, pour order 55): 5150.73,8257.87 5180.26,8257.87 5180.26,8385.83 5150.73,8385.83
GND on Top Layer "GND_L01_P054" (solid, remove dead copper, pour order 54): 5150.73,8533.46 5180.26,8533.46 5180.26,9015.75 5150.73,9015.75
GND on Top Layer "GND_L01_P053" (solid, remove dead copper, pour order 53): 6125.14,8385.83 5150.73,8385.83 5150.73,8533.46 5900.06,8533.46 5650.51,9349.72 5796.94,9394.49 6060.18,8533.46 6125.14,8533.46
GND on Top Layer "GND_L01_P052" (solid, remove dead copper, pour order 52): 5150.73,9015.75 5180.26,9015.75 5180.26,9074.8 5150.73,9074.8
GND on Top Layer "GND_L01_P049" (solid, remove dead copper, pour order 49): 4648.76,6722.44 4845.61,6722.44 4845.61,7096.46 4648.76,7096.46
GND on Top Layer "GND_L01_P046" (solid, remove dead copper, pour order 46): 5180.26,8257.87 5416.48,8257.87 5416.48,8385.83 5180.26,8385.83
GND on Top Layer "GND_L01_P045" (solid, remove dead copper, pour order 45): 5416.48,7352.36 5455.85,7352.36 5455.85,8385.83 5416.48,8385.83
GND on Top Layer "GND_L01_P043" (solid, remove dead copper, pour order 43): 1705.85,9301.18 1823.96,9419.29 1823.96,9301.18
GND on Top Layer "GND_L01_P042" (solid, remove dead copper, pour order 42): 1509,7362.2 1617.27,7253.94 1617.27,7362.2
GND on Top Layer "GND_L01_P041" (solid, remove dead copper, pour order 41): 1440.1,8671.26 1617.27,8848.43 1617.27,8671.26
GND on Top Layer "GND_L01_P040" (solid, remove dead copper, pour order 40): 1823.96,8986.22 2306.24,8986.22 2306.24,9448.82 1823.96,9448.82
GND on Top Layer "GND_L01_P039" (solid, remove dead copper, pour order 39): 3290.5,7165.35 4353.49,7165.35 4353.49,7214.57 3290.5,7214.57
GND on Top Layer "GND_L01_P038" (solid, remove dead copper, pour order 38): 5829.87,8533.46 5180.26,8533.46 5180.26,9379.92 5367.27,9566.93 5581.34,9566.93 5829.87,9368.11
GND on Top Layer "GND_L01_P037" (solid, remove dead copper, pour order 37): 3861.36,9655.51 4009,9507.87 3861.36,9507.87
GND on Top Layer "GND_L01_P036" (solid, remove dead copper, pour order 36): 3398.76,7421.26 3447.98,7421.26 3447.98,7795.28 3398.76,7795.28
GND on Top Layer "GND_L01_P035" (solid, remove dead copper, pour order 35): 2306.24,7559.06 2532.62,7559.06 2532.62,7608.27 2306.24,7608.27
GND on Top Layer "GND_L01_P034" (solid, remove dead copper, pour order 34): 3861.36,9448.82 1823.96,9448.82 1823.96,9537.4 2316.09,10029.53 2552.31,10029.53 2926.32,10403.54 3044.43,10403.54 3044.43,10206.69 3201.91,10049.21 3497.19,10049.21 3556.24,10108.27 3782.62,10108.27 3782.62,9655.51 3861.36,9655.51
GND on Top Layer "GND_L01_P030" (solid, remove dead copper, pour order 30): 2306.24,8986.22 2532.62,8986.22 2532.62,9084.65 2306.24,9084.65
GND on Top Layer "GND_L01_P029" (solid, remove dead copper, pour order 29): 2296.4,8080.71 2532.62,8080.71 2532.62,8248.03 2296.4,8248.03
GND on Top Layer "GND_L01_P028" (solid, remove dead copper, pour order 28): 2296.4,8248.03 2532.62,8248.03 2532.62,8287.4 2296.4,8287.4
GND on Top Layer "GND_L01_P027" (solid, remove dead copper, pour order 27): 1951.91,7411.42 2296.4,7411.42 2296.4,8415.35 1951.91,8415.35
GND on Top Layer "GND_L01_P026" (solid, remove dead copper, pour order 26): 3398.76,7214.57 2778.68,7214.57 2601.52,7391.73 2601.52,7559.06 2532.62,7559.06 2532.62,9448.82 3398.76,9448.82
GND on Top Layer "GND_L01_P025" (solid, remove dead copper, pour order 25): 5140.89,9074.8 5180.26,9074.8 5180.26,9379.92 5140.89,9379.92
GND on Top Layer "GND_L01_P024" (solid, remove dead copper, pour order 24): 4973.57,9311.02 5140.89,9311.02 5140.89,9379.92 4973.57,9379.92
GND on Top Layer "GND_L01_P023" (solid, remove dead copper, pour order 23): 5829.87,8828.74 6125.14,8533.46 5829.87,8533.46
GND on Top Layer "GND_L01_P021" (solid, remove dead copper, pour order 21): 1823.96,7253.94 1617.27,7253.94 1617.27,7362.2 1440.1,7362.2 1440.1,7667.32 1499.16,7667.32 1499.16,8090.55 1440.1,8090.55 1440.1,8671.26 1617.27,8671.26 1617.27,9212.6 1705.85,9301.18 1823.96,9301.18
~IN_COM on Top Layer "~IN_COM_L01_P019" (solid, remove dead copper, pour order 19): 4908.01,10071 4753.37,9803.15 4721.48,9803.15 4638.92,9850.82 4638.92,9911.42 4638.32,9911.42 4774.84,10147.88
~IN_COM on Top Layer "~IN_COM_L01_P017" (solid, remove dead copper, pour order 17): 4392.86,9732.17 4345.98,9616.14 4143.89,9616.14 4070.38,9645.84 4204.93,9978.87 4392.86,9902.95
IN_COM on Top Layer "IN_COM_L01_P015" (solid, remove dead copper, pour order 15): 5377.11,9743.75 5343.21,9685.04 5121.2,9685.04 5121.2,9547.24 4934.2,9547.24 4934.2,9744.09 4933.59,9744.09 5070.53,9981.29 5377.11,9804.29
IN_COM on Top Layer "IN_COM_L01_P014" (solid, remove dead copper, pour order 14): 5121.2,9547.24 5259,9685.04 5121.2,9685.04
OUT on Top Layer "OUT_L01_P012" (solid, remove dead copper, pour order 12): 4540.5,9803.15 4648.76,9694.88 4540.5,9694.88
OUT on Top Layer "OUT_L01_P011" (solid, remove dead copper, pour order 11): 4894.83,9547.24 4638.92,9547.24 4491.28,9694.88 4894.83,9694.88
OUT on Top Layer "OUT_L01_P010" (solid, remove dead copper, pour order 10): 4491.28,9694.88 4540.5,9694.88 4540.5,9940.94 4491.28,9940.94
OUT on Top Layer "OUT_L01_P007" (solid, remove dead copper, pour order 7): 4369.95,9988.2 4540.88,9919.14 4677.19,10256.53 4506.27,10325.59
OUT on Top Layer "OUT_L01_P006" (solid, remove dead copper, pour order 6): 5340.7,11113.28 5276.63,10992.77 5107.03,11082.95 4657.92,10238.3 4614.11,10261.6 5110.97,11196.06 5111.95,11195.54 5128.27,11226.24
~OUT on Top Layer "~OUT_L01_P005" (solid, remove dead copper, pour order 5): 4105.45,11022.79 4206.05,11842.16 4255.27,11836.12 4154.67,11016.75
~OUT on Top Layer "~OUT_L01_P004" (solid, remove dead copper, pour order 4): 3865.11,10862.7 3893.25,11091.96 4434.27,11025.53 4406.12,10796.28
~OUT on Top Layer "~OUT_L01_P003" (solid, remove dead copper, pour order 3): 4320.52,10441.41 4365.62,10808.79 4400.22,10804.54 4355.11,10437.16
~OUT on Top Layer "~OUT_L01_P002" (solid, remove dead copper, pour order 2): 4366.79,10454.82 4046.11,9661.12 3885.28,9726.1 4190.79,10482.28 4298.81,10482.28
~OUT on Top Layer "~OUT_L01_P001" (solid, remove dead copper, pour order 1): 7604.02,8159.45 ccw(c3802.31,8159.45) 3802.31,11961.16 ccw(c3802.31,8159.45) 0.6,8159.45 ccw(c3802.31,8159.45) 3802.31,4357.74 ccw(c3802.31,8159.45) 7604.02,8159.45 ccw(c3802.31,8159.45)

## Other copper
Top Layer:
  pour cut-out: 3447.98,8562.99 3841.68,8562.99 3841.68,8927.17 3447.98,8927.17
  pour cut-out: 4028.68,9232.28 4400.73,9232.28 4400.73,9330.71 4028.68,9330.71
  pour cut-out: 2739.31,9862.2 3103.49,9862.2 3103.49,9940.94 2739.31,9940.94
  pour cut-out: 1607.42,7474.41 1690.1,7474.41 1690.1,8230.32 1607.42,8230.32
  pour cut-out: 7444.04,8159.45 ccw(c3802.31,8159.45) 3802.31,11801.18 ccw(c3802.31,8159.45) 160.57,8159.45 ccw(c3802.31,8159.45) 3802.31,4517.72 ccw(c3802.31,8159.45)
  text "COM-1" at 4810.18,7423.23 h78.74
Bottom Layer:
  pour cut-out: 4314.12,6751.97 4461.76,6751.97 4461.76,6879.92 4314.12,6879.92
  pour cut-out: 4333.8,6358.27 4442.07,6358.27 4442.07,6476.38 4333.8,6476.38
  pour cut-out: 7434.2,8159.45 ccw(c3792.46,8159.45) 3792.46,11801.18 ccw(c3792.46,8159.45) 150.73,8159.45 ccw(c3792.46,8159.45) 3792.46,4517.72 ccw(c3792.46,8159.45)

## Silkscreen, mask and mechanical layers (free items; w line width, h text height)
Bottom Overlay:
  lines w0: 3227.5,9812.99 3227.5,9980.32 3274.75,9980.32 3276.72,10125.98 3371.2,10125.98 3371.2,10279.53 3512.94,10279.53 ; 4001.13,9671.26 4068.05,9671.26 4068.05,9403.54 4032.62,9403.54 4032.62,9104.33 ; 4392.86,8771.65 4392.86,9080.71 ; 4536.56,9039.37 4536.56,9500 4570.02,9500 4570.02,9858.27
  text "CH-1" at 3505.06,11835.43 h78.74 r7
  text "CH-16" at 5082.62,11617.32 h78.74 r342
  text "CH-2" at 2173.57,11479.53 h78.74 r28
  text "TP35" at 1879.47,11257.09 h59.06
  text "CH-15" at 6344.04,10848.03 h78.74 r320
  text "CH-3" at 946.01,10524.41 h78.74 r52
  text "CH-14" at 7217.66,9648.03 h78.74 r297
  text "CH-4" at 257.42,9352.36 h78.74 r72
  text "CH-13" at 7557.03,8337.4 h78.74 r277
  text "CH-5" at 155.85,7531.89 h78.74 r277
  text "CH-12" at 7383.41,7215.75 h78.74 r73
  text "CH-6" at 573.57,6286.61 h78.74 r297
  text "CH-11" at 6811.76,5942.13 h78.74 r50
  text "CH-7" at 1521.6,5200 h78.74 r322
  text "CH-10" at 5709.39,4922.44 h78.74 r29
  text "CH-8" at 2814.9,4521.26 h78.74 r343
  text "CH-9" at 4374.75,4424.8 h78.74 r6